# Altium PCB FieldSensor.PcbDoc
Units mm, origin at the board's own origin, x right, y up, seen from the top; angles counter-clockwise.
Board outline 34.2 x 92.15 mm, 2 copper layers (Top Layer, Bottom Layer), stack 0.151 mm thick; 64 components, 59 nets, 185 pads, 182 vias.
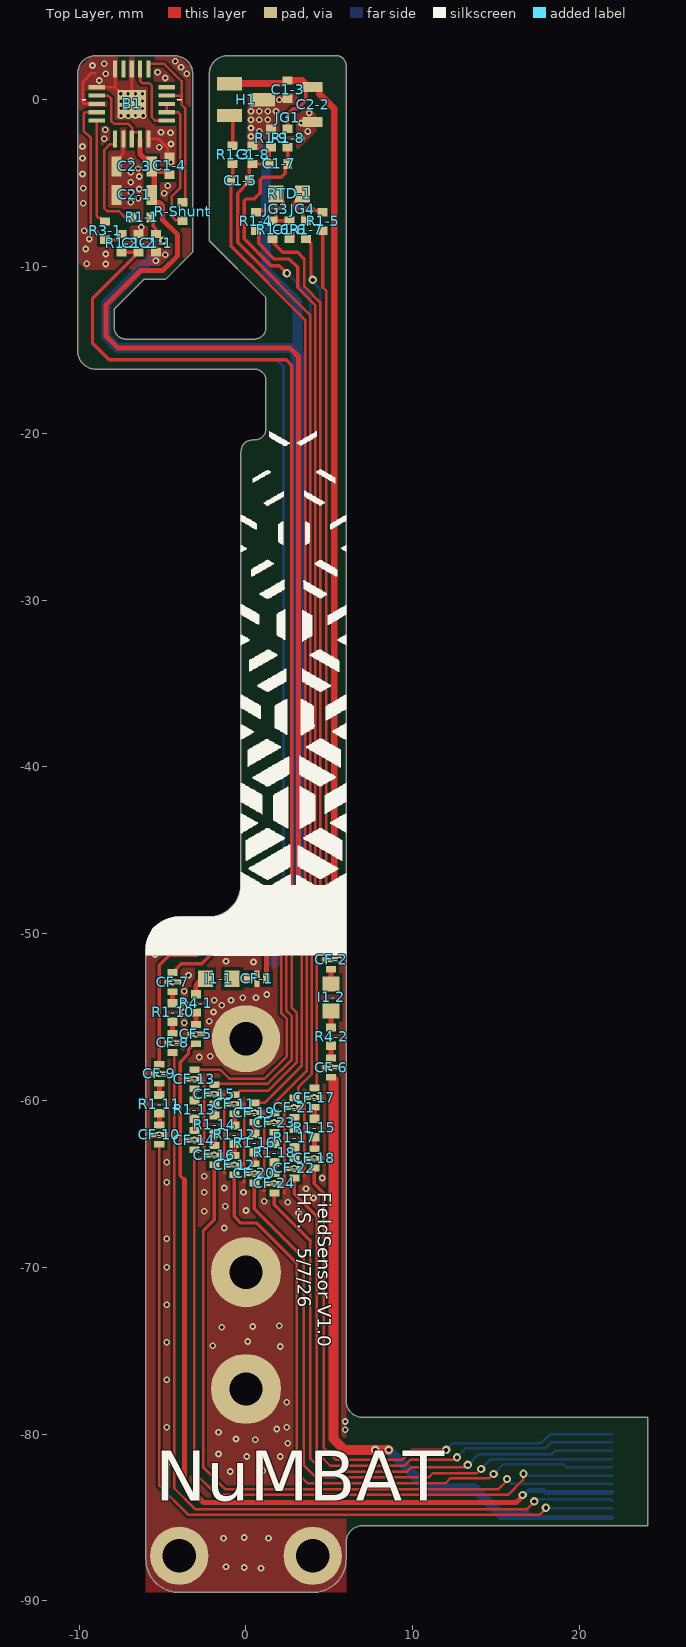
[diagram p0: Top Layer view]
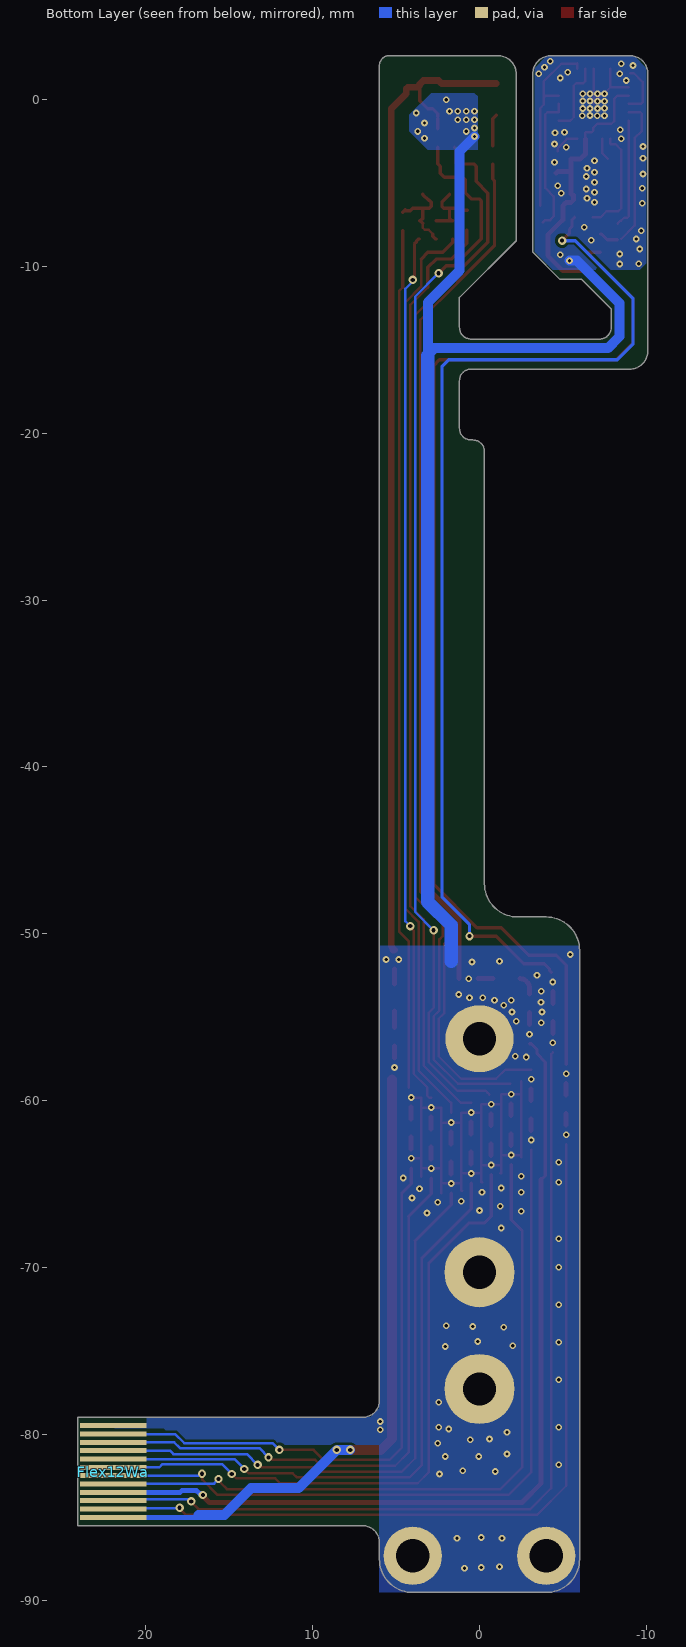
[diagram p1: Bottom Layer view, seen from below]

## Layer stack, top to bottom
Top Solder: solder mask 0.012, FC-001, Dk 4
Top Solder: solder mask 0.0254, SM-001, Dk 4
Top Layer: signal copper 0.0356
Dielectric 1: dielectric 0.08, FR-4, Dk 4.8
Bottom Layer: signal copper 0.0356
Flex Bottom Coverlay: solder mask 0.0254, SM-001, Dk 4
Flex Bottom Coverlay: solder mask 0.012, FC-001, Dk 4

## Board outline
-9,-16.15 cw(c-9,-15.05) -10.1,-15.05 -10.1,1.55 cw(c-9,1.55) -9,2.65 -4.3,2.65 cw(c-4.3,1.55) -3.2,1.55 -3.2,-9.15 -4.8,-10.75 -6.1,-10.75 -7.9,-12.55 -7.9,-13.65 ccw(c-7.2,-13.65) -7.2,-14.35 0.5,-14.35 ccw(c0.5,-13.65) 1.2,-13.65 1.2,-11.85 -2.2,-8.45 -2.2,1.55 cw(c-1.1,1.55) -1.1,2.65 5.4,2.65 cw(c5.4,2.05) 6,2.05 6,-78 ccw(c7,-78) 7,-79 24.1,-79 24.1,-85.5 7,-85.5 ccw(c7,-86.5) 6,-86.5 6,-87.5 cw(c4,-87.5) 4,-89.5 -4,-89.5 cw(c-4,-87.5) -6,-87.5 -6,-51 cw(c-4,-51) -4,-49 -2.3,-49 ccw(c-2.3,-47) -0.3,-47 -0.3,-21.1 cw(c0.4,-21.1) 0.4,-20.4 0.5,-20.4 ccw(c0.5,-19.7) 1.2,-19.7 1.2,-16.85 ccw(c0.5,-16.85) 0.5,-16.15

## Design rules (kind name [scope] priority, off if disabled: settings)
Clearance [All] p1: gap=0.2 ignorepadtopadclearanceinfootprint=TRUE except(0: Arc-Text Track-Text SMDPad-Text THPad-Text Via-Text Fill-Text Poly-Text Region-Text Text-Text Text-Hole; 0.15: Arc-Arc Arc-Track Arc-Fill Arc-Poly Arc-Region Track-Track Track-Fill Track-Poly Track-Region THPad-Fill THPad-Poly THPad-Region; 0.17: Arc-SMDPad Arc-THPad Arc-Via Track-SMDPad Track-THPad Track-Via SMDPad-SMDPad SMDPad-THPad SMDPad-Via THPad-Via Via-Via; 0.22: SMDPad-Hole THPad-Hole Via-Hole; 0.25: Fill-Hole Poly-Hole Region-Hole)
DiffPairsRouting [All] p1: maxlimit=0.254 minlimit=0.254 mostfreqgap=0.254 toplayer_minwidth=0.381 toplayer_maxwidth=0.381 toplayer_prefwidth=0.381 bottomlayer_minwidth=0.381 bottomlayer_maxwidth=0.381 bottomlayer_prefwidth=0.381 substack1={8121588E-2F91-4279-9075-7C01D68EC4AE} toplayer_{8121588e-2f91-4279-9075-7c01d68ec4ae}_minwidth=0.381 toplayer_{8121588e-2f91-4279-9075-7c01d68ec4ae}_maxwidth=0.381 toplayer_{8121588e-2f91-4279-9075-7c01d68ec4ae}_prefwidth=0.381 bottomlayer_{8121588e-2f91-4279-9075-7c01d68ec4ae}_minwidth=0.381 bottomlayer_{8121588e-2f91-4279-9075-7c01d68ec4ae}_maxwidth=0.381 bottomlayer_{8121588e-2f91-4279-9075-7c01d68ec4ae}_prefwidth=0.381 maxuncoupledlength=12.7
HoleSize [All] p1: absolutevalues=TRUE maxlimit=99 minlimit=0.025 maxpercent=80.000 minpercent=20.000
MinimumSolderMaskSliver [All] p1: minsoldermaskwidth=0
PlaneConnect [All] p1: planeconnectstyle=Direct reliefexpansion=0.508 reliefentries=4 reliefconductorwidth=0.254 reliefairgap=0.254
PolygonConnect [All] p1: connectstyle=Direct reliefconductorwidth=0.5 reliefentries=4 polygonreliefangle="90 Angle" airgapwidth=0.254
RoutingVias [All] p1: holewidth=0.45 width=0.8 viastyle="Through Hole" minholewidth=0.3 minwidth=0.5 maxholewidth=2 maxwidth=10
SolderMaskExpansion [All] p1: expansion=0.102 istentingtop=FALSE
Width [All] p1: maxlimit=50 minlimit=0.1 preferedwidth=0.254 substack1={8121588E-2F91-4279-9075-7C01D68EC4AE} minimp=50.000000 maximp=50.000000 favimp=50.000000
26 further rules are at their usual default settings.

## Components (designator, comment, footprint, x,y, rotation, side; value= is the part's Value field where it differs from the comment)
B1 "DRV425_FluxGate" 20-WQFN -6.851,-0.253 r0 top
C1-1 "100pF Non Magnetic" 0402 -5.4,-9.15 r90 top
C1-2 "100pF Non Magnetic" 0402 -6.45,-9.15 r90 top
C1-3 "100pF Non Magnetic" 0402 2.5,1.15 r270 top
C1-4 "100pF Non Magnetic" 0402 -4.6,-4.5 r90 top
C1-5 "100pF Non Magnetic" 0402 0.2,-4.85 r180 top
C1-6 "100pF Non Magnetic" 0402 2.6,-7.25 r270 top
C1-7 "100pF Non Magnetic" 0402 2.5,-3.85 r180 top
C1-8 "100pF Non Magnetic" 0402 0.4,-3.85 r90 top
C2-1 "0.22uF Non Magnetic" 0805_Compact -7.75,-5.7 r0 top
C2-2 "0.22uF Non Magnetic" 0805_Compact 4,-1.35 r90 top
C2-3 "0.22uF Non Magnetic" 0805_Compact -7.75,-4 r0 top
CF-1 "0.22u" 0402-Passthrough 1.225,-52.7 r180 top
CF-2 "0.22u" 0402-Passthrough 5.1,-50.975 r270 top
CF-5 "0.22u" 0402-Passthrough -3,-55.45 r270 top
CF-6 "0.22u" 0402-Passthrough 5.1,-57.45 r270 top
CF-7 "0.22u" 0402-Passthrough -4.4,-52.325 r270 top
CF-8 "0.22u" 0402-Passthrough -4.4,-55.975 r270 top
CF-9 "0.22u" 0402-Passthrough -5.2,-57.825 r270 top
CF-10 "0.22u" 0402-Passthrough -5.2,-61.475 r270 top
CF-11 "0.22u" 0402-Passthrough -0.7,-59.65 r270 top
CF-12 "0.22u" 0402-Passthrough -0.7,-63.3 r270 top
CF-13 "0.22u" 0402-Passthrough -3.1,-58.15 r270 top
CF-14 "0.22u" 0402-Passthrough -3.1,-61.8 r270 top
CF-15 "0.22u" 0402-Passthrough -1.9,-59.05 r270 top
CF-16 "0.22u" 0402-Passthrough -1.9,-62.7 r270 top
CF-17 "0.22u" 0402-Passthrough 4.1,-59.25 r270 top
CF-18 "0.22u" 0402-Passthrough 4.1,-62.9 r270 top
CF-19 "0.22u" 0402-Passthrough 0.5,-60.15 r270 top
CF-20 "0.22u" 0402-Passthrough 0.5,-63.8 r270 top
CF-21 "0.22u" 0402-Passthrough 2.9,-59.85 r270 top
CF-22 "0.22u" 0402-Passthrough 2.9,-63.5 r270 top
CF-23 "0.22u" 0402-Passthrough 1.7,-60.75 r270 top
CF-24 "0.22u" 0402-Passthrough 1.7,-64.4 r270 top
Flex12Wa "F12" FLex12Way 21.95,-79.5 r0 top
H1 "DRV5055_Hall" SOT23-3 -1,0.95 r0 top
I1-1 "39nH" 0603 -2.425,-52.7 r0 top
I1-2 "39nH" 0603 5.1,-54.625 r90 top
JG1 "Jumper_Ground_Tiny" GndConnectorTiny 2.5,-1 r180 top
JG3 "Jumper_Ground_Tiny" GndConnectorTiny 1.8,-6.5 r180 top
JG4 "Jumper_Ground_Tiny" GndConnectorTiny 3.4,-6.5 r180 top
R1-1 "100 Non Magnetic" 0402 -6.8,-7.05 r0 top
R1-2 "100 Non Magnetic" 0402 -7.45,-9.15 r90 top
R1-3 "100 Non Magnetic" 0402 -0.8,-2.75 r270 top
R1-4 "100 Non Magnetic" 0402 0.6,-7.85 r90 top
R1-5 "100 Non Magnetic" 0402 4.6,-6.75 r270 top
R1-6 "100 Non Magnetic" 0402 1.6,-8.35 r90 top
R1-7 "100 Non Magnetic" 0402 3.6,-8.35 r90 top
R1-8 "100 Non Magnetic" 0402 2.5,-2.85 r90 top
R1-9 "100 Non Magnetic" 0402 1.5,-2.85 r90 top
R1-10 "100 Non Magnetic" 0402 -4.4,-54.175 r270 top
R1-11 "100 Non Magnetic" 0402 -5.2,-59.675 r270 top
R1-12 "100 Non Magnetic" 0402 -0.7,-61.5 r270 top
R1-13 "100 Non Magnetic" 0402 -3.1,-60 r270 top
R1-14 "100 Non Magnetic" 0402 -1.9,-60.9 r270 top
R1-15 "100 Non Magnetic" 0402 4.1,-61.1 r270 top
R1-16 "100 Non Magnetic" 0402 0.5,-62 r270 top
R1-17 "100 Non Magnetic" 0402 2.9,-61.7 r270 top
R1-18 "100 Non Magnetic" 0402 1.7,-62.6 r270 top
R3-1 "60.4" 0402 -8.45,-8.4 r90 top
R4-1 "510m" 0402 -3,-53.625 r270 top
R4-2 "510m" 0402 5.1,-55.625 r270 top
R-Shunt "15.0 0.1%" 0402 -3.8,-6.15 r270 top
RTD-1 "RTD_SMD" 0603 3.4,-5.65 r180 top

## Footprints (in the part's own frame and the unit in brackets; to place one, negate y for a bottom-side part, rotate by r counter-clockwise, add the part's x,y. Pads: shape width x height; smd on the part's side, far side on the other; paste and mask are expansions set on the pad)
20-WQFN [mm]
  rect 1x0.25 smd paste+0: 1(-2.1,1) 2(-2.1,0.5) 3(-2.1,0) 4(-2.1,-0.5) 5(-2.1,-1) 11(2.1,-1) 12(2.1,-0.5) 13(2.1,0) 14(2.1,0.5) 15(2.1,1)
  rect 0.25x1 smd paste+0: 6(-1,-2.1) 7(-0.5,-2.1) 8(0,-2.1) 9(0.5,-2.1) 10(1,-2.1) 16(1,2.1) 17(0.5,2.1) 18(0,2.1) 19(-0.5,2.1) 20(-1,2.1)
  rect 1.7x1.7 smd paste+0: 21(0,0)
  silkscreen extent -2.95,0.26 2.95,0.26
0402 [mm]
  rect 0.5x0.6 smd mask+0.05: 1(0,0) 2(1.1,0)
0402-Passthrough [mm]
  rect 0.4x0.6 smd mask+0.05: 1(0,0) 2(1.15,0)
  rect 0.3x1 smd mask+0.05: 3(0.575,0)
0603 [mm]
  rect 0.9x1 smd mask+0.05: 1(0,0) 2(1.6,0)
0805_Compact [mm]
  rect 0.6x1.2 smd: 1(2.1,0) 2(0,0)
FLex12Way [mm]
  rect 4x0.3 smd far side mask+0.15: 1(0,0) 2(0,-0.5) 3(0,-1) 4(0,-1.5) 5(0,-2) 6(0,-2.5) 7(0,-3) 8(0,-3.5) 9(0,-4) 10(0,-4.5) 11(0,-5) 12(0,-5.5)
GndConnectorTiny [mm]
  rect 0.2x0.2 smd paste-100 mask+0.1: 1(0,0.15)
  rect 0.2x0.2 smd paste-10 mask+0.1: 2(0,0)
SOT23-3 [mm]
  rect 1.5x0.8 smd mask+0.02: 1(0,0) 2(0,-1.9) 3(2,-0.95)

## Part data
C1-1 C1-2 C1-3 C1-4 C1-5 C1-6 C1-7 C1-8 C2-1 C2-2 C2-3: library part Capacitor1
  C1-1 C1-2 C1-3 C1-4 C1-5 C1-6 C1-7 C1-8: Digikey P/N=1608-1288-1-ND
  C2-1 C2-2 C2-3: Digikey P/N=1608-1296-1-ND
CF-1 CF-2 CF-5 CF-6 CF-7 CF-8 CF-9 CF-10 CF-11 CF-12 CF-13 CF-14 CF-15 CF-16 CF-17 CF-18 CF-19 CF-20 CF-21 CF-22 CF-23 CF-24: library part CapFeedthrough, Digikey P/N=445-YFF15AC1V224MT0Y0NCT-ND
I1-1 I1-2: library part Inductor0603, Digikey P/N=490-15822-1-ND
R1-1 R1-2 R1-3 R1-4 R1-5 R1-6 R1-7 R1-8 R1-9 R1-10 R1-11 R1-12 R1-13 R1-14 R1-15 R1-16 R1-17 R1-18 R3-1 R4-1 R4-2 R-Shunt: library part Res1
  R1-1 R1-2 R1-3 R1-4 R1-5 R1-6 R1-7 R1-8 R1-9 R1-10 R1-11 R1-12 R1-13 R1-14 R1-15 R1-16 R1-17 R1-18: Digikey P/N=541-1899-1-ND
  R3-1: Digikey P/N=A139440CT-ND
  R4-1 R4-2: Digikey P/N=541-4385-1-ND
  R-Shunt: Digikey P/N=A102634CT-ND
B1: Digikey P/N=296-DRV425QWRTJRQ1CT-ND
H1: Digikey P/N=296-DRV5055Z3QDBZRCT-ND
RTD-1: Digikey P/N=2952-P1K0.0603.3FC.B-ND

## Free pads (board coordinates)
  oval 4.1x4 hole 2 mask+0: 0(0,-56.3)
  round 3.5 hole 2 mask+0: 3(-4,-87.3) 3(4,-87.3)
  round 4.2 hole 2 mask+0: 3(0,-77.3) 4(0,-70.3)

## Via types
v1: diameter 0.4, hole 0.2, Top Layer to Bottom Layer, tented both sides, 164 vias
v2: diameter 0.5, hole 0.25, Top Layer to Bottom Layer, tented both sides, 18 vias

## Nets (pads, with @x,y where several pads share a name; then routed paths per layer and width w, separated by ;. In a path a pad name is that pad's centre, name@x,y a point inside that pad or via, vN(x,y) a via of type N, cw(c..) or ccw(c..) an arc to the next point about the centre after c; other vN are vias at no path point)
5V: CF-6.2 Flex12Wa.12 | length 42.3
  Top Layer w0.6: CF-6.2@5.25,-58.75 5.25,-80.3 5.9,-80.95 ; 6.05,-80.95 v2(7.75,-80.95) v2(8.556,-80.95)
  Bottom Layer w0.3: 15.3,-85 Flex12Wa.12
  Bottom Layer w0.6: v2(7.75,-80.95) v2(8.556,-80.95) 10.856,-83.25 13.7,-83.25 15.3,-84.85 16.85,-84.85
BOut1: C1-1.2 CF-7.1 R1-1.2 | length 62.9
  Top Layer w0.2: R1-1.2 -5.55,-7.2 -5.55,-7.6 -5.4,-7.75 C1-1.2 -5.35,-8.05 -4.954,-8.445 v2(-4.954,-8.447) ; CF-7.1@-4.3,-52.325 -4.2,-52.225 -4.2,-52.125 -3.875,-51.8 -2.65,-51.8 -1,-50.15 v2(0.6,-50.15)
  Bottom Layer w0.2: v2(-4.954,-8.447) -5.747,-8.447 -9.2,-11.9 -9.2,-14.657 -8.257,-15.6 1.85,-15.6 2.25,-16 2.25,-47.8 0.6,-49.45 v2(0.6,-50.15)
BOut1_Con: CF-8.2 Flex12Wa.10 | length 53.2
  Top Layer w0.15: CF-8.2 -4.3,-57.225 -4.3,-83.25 -3.05,-84.5 16.85,-84.5 17.286,-84.064 v2(17.286,-84.04)
  Bottom Layer w0.15: v2(17.286,-84.04) 17.381,-84.04 17.501,-83.919 19.937,-83.919 19.943,-83.925 21.875,-83.925 Flex12Wa.10
BOut2: C1-2.1 CF-9.1 R1-2.1 | length 66.9
  Top Layer w0.2: R1-2.1@-7.25,-9.15 C1-2.1@-6.5,-9.15 ; C1-2.1 C1-2.1@-6.5,-9.15 ; CF-9.1 -5.2,-51.9 -4.6,-51.3 -2.95,-51.3 -1.3,-49.65 0.15,-49.65 2.75,-47.05 2.75,-15.95 2.4,-15.6 -8.202,-15.6 -9.2,-14.602 -9.2,-11.9 -6.65,-9.35 -6.65,-9.3 C1-2.1@-6.5,-9.15
BOut2_Con: CF-10.2 Flex12Wa.11 | length 48.6
  Top Layer w0.15: CF-10.2 -5.2,-83.1 -3.45,-84.85 17.6,-84.85 17.981,-84.469 v2(17.981,-84.417)
  Bottom Layer w0.15: v2(17.981,-84.417) 18.014,-84.45 21.9,-84.45 Flex12Wa.11
GND: B1.1 B1.3 B1.7 B1.10 B1.18 B1.20 B1.21 C1-1.1 C1-2.2 C1-3.2 C1-4.2 C1-8.2 C2-1.2 C2-2.2 C2-3.2 CF-1.3 CF-2.3 CF-5.3 CF-6.3 CF-7.3 CF-8.3 CF-9.3 CF-10.3 CF-11.3 CF-12.3 CF-13.3 CF-14.3 CF-15.3 CF-16.3 CF-17.3 CF-18.3 CF-19.3 CF-20.3 CF-21.3 CF-22.3 CF-23.3 CF-24.3 Flex12Wa.1 H1.3 pad.0 pad.3 pad.4 R1-9.2 | length 123.4
  Top Layer w0.15: -9.05,1.6 -9.25,1.6 -9.783,1.067 -9.783,-0.165 -9.695,-0.253 B1.3 ; B1.1 -7.851,0.747 ; B1.20 -7.851,0.747 ; C2-3.2@-7.7,-3.55 -7.351,-3.201 B1.7 ; v1(-7.5,0.35) -7.354,0.35 B1.21@-7.05,0.046 ; B1.21@-7.354,0.25 -7.851,0.747 ; B1.21@-7.05,0.35 B1.21@-7.05,0.046 ; B1.21 B1.18 ; B1.21@-6.851,-0.153 B1.21@-7.05,0.046 ; B1.10 -5.247,-2.353 -4.7,-2.9 -4.7,-3.1 ; -2.5,-63.4 -2.5,-63.275 ; -2.5,-58.85 -2.5,-59.625 ; -1.25,-64.365 -1.3,-64.365 -1.3,-63.875 ; -0.177,-64.9 -0.1,-64.9 -0.1,-64.375 ; 1.023,-65.4 1.1,-65.4 1.1,-64.975 ; 1.1,-61.3 1.1,-61.325 ; 2.3,-65.55 2.3,-64.975 ; 2.3,-61.3 2.3,-61.325 ; 3.5,-64.565 3.5,-64.075 ; 3.5,-64.02 3.5,-64.075 ; v1(4.1,-63.475) 3.5,-63.475 ; v1(4.1,-59.825) 3.5,-59.825 3.5,-60.425 ; -2.5,-63.275 -2.5,-59.625 ; -2.5,-63.275 v1(-1.9,-63.275) -1.9,-63.3 -1.3,-63.3 ; -2.5,-59.625 v1(-1.9,-59.625) -1.3,-59.625 -1.3,-60.225 ; -1.3,-63.875 -1.3,-63.3 ; -1.3,-63.875 v1(-0.7,-63.875) -0.1,-63.875 ; -1.3,-63.3 -1.3,-60.225 ; -1.3,-60.225 v1(-0.7,-60.225) -0.1,-60.225 -0.1,-60.725 ; -0.1,-64.375 -0.1,-63.875 ; -0.1,-64.375 v1(0.5,-64.375) 1.1,-64.375 ; -0.1,-63.875 -0.1,-60.725 ; -0.1,-60.725 v1(0.5,-60.725) 1.1,-60.725 1.1,-61.325 ; 1.1,-64.975 1.1,-64.375 ; 1.1,-64.975 v1(1.7,-64.975) 2.3,-64.975 ; 1.1,-64.375 1.1,-61.325 ; 1.1,-61.325 v1(1.7,-61.325) 2.3,-61.325 ; 2.3,-64.975 2.3,-64.075 ; 2.3,-64.075 2.3,-61.325 ; 2.3,-64.075 v1(2.9,-64.075) 3.5,-64.075 ; 2.3,-61.325 2.3,-60.425 v1(2.9,-60.425) 3.5,-60.425 ; 3.5,-64.075 3.5,-63.475 ; 3.5,-63.475 3.5,-60.425
  Bottom Layer w0.6: v1(-5.4,-9.65) -5.85,-9.65 -8.4,-12.2 -8.4,-14.2 -7.7,-14.9 2.7,-14.9 3.143,-15.343 ; v1(0.3,-2.2) 1.2,-3.1 1.2,-10.25 3.1,-12.15 3.1,-15.343
  Bottom Layer w0.8: 1.7,-51.65 1.7,-49.5 3.1,-48.1 3.1,-15.343
  other v1: 0.9,-88.05 -0.1,-88 -1.2,-87.95 -1.35,-86.25 1.35,-86.25 -0.1,-86.2 2.4,-82.4 -0.95,-82.25 1,-82.2 -4.75,-81.85 0.05,-81.35 2.05,-81.35 -1.65,-81.2 2.5,-80.55 0.55,-80.35 -0.6,-80.3 -1.65,-79.9 5.95,-79.75 1.85,-79.7 -4.75,-79.6 2.45,-79.6 5.95,-79.25 2.45,-78.1 -4.75,-76.75 2.05,-74.75 -2,-74.7 -4.75,-74.5 0.1,-74.45 -1.45,-73.6 0.4,-73.55 2,-73.5 -4.75,-72.25 -4.75,-70 -4.75,-68.3 -1.3,-67.65 3.15,-66.75 -2.5,-66.65 0,-66.6 -1.25,-66.35 2.5,-66.1 1.1,-66.05 4.05,-65.85 -2.5,-65.5 -0.15,-65.5 3.6,-65.3 -1.3,-65.25 -4.75,-64.9 4.577,-64.65 -2.5,-64.55 -4.75,-63.7 -3.1,-62.375 -5.2,-62.05 -3.1,-58.725 -5.2,-58.4 5.1,-58.025 -2.8,-57.4 -2.15,-57.35 -4.4,-56.55 -3,-56.025 -3.7,-55.35 -2.2,-55.25 -3.75,-54.7 -1.95,-54.7 -1.45,-54.3 -3.685,-54.103 -1.9,-54 -0.9,-54 -0.2,-53.85 0.6,-53.85 1.25,-53.65 -3.693,-53.453 -4.4,-52.9 0.65,-52.7 -3.45,-52.5 0.45,-51.7 -1.2,-51.65 4.85,-51.55 5.6,-51.55 -5.45,-51.25 -8.4,-9.85 -9.55,-9.825 -4.848,-9.294 -8.4,-9.25 -9.6,-8.95 -6.7,-8.425 -9.4,-8.35 -9.7,-7.85 -6.275,-7.65 -9.75,-6.2 -6.9,-6.15 -6.45,-5.9 -4.9,-5.6 -6.9,-5.55 -6.4,-5.35 -9.75,-5.3 -4.7,-5.15 -6.9,-4.95 -6.4,-4.6 -9.8,-4.45 -6.9,-4.35 -6.45,-4.1 -4.5,-3.75 -6.9,-3.65 -9.8,-3.5 -5.2,-2.85 -9.8,-2.8 -4.5,-2.65 -8.5,-2.342 3.3,-2.3 -4.525,-1.975 -5.1,-1.95 0.8,-1.9 3.7,-1.9 -8.447,-1.796 0.3,-1.7 3.3,-1.4 0.3,-1.2 0.8,-1.2 1.3,-1.2 -7.497,-0.964 -7.066,-0.96 -6.625,-0.95 -6.16,-0.964 3.8,-0.8 0.3,-0.7 0.8,-0.7 1.3,-0.7 1.8,-0.7 -7.492,-0.517 -7.071,-0.531 -6.628,-0.527 -6.2,-0.525 -7.496,-0.082 -7.071,-0.084 -6.628,-0.078 -6.2,-0.075 2,0 -7.075,0.35 -6.625,0.35 -6.2,0.35 -8.8,1.15 -4.85,1.3 -8.4,1.55 -3.55,1.55 -5.3,1.65 -3.9,1.95 -9.2,2.05 -8.5,2.15 -4.25,2.3
GND_Hall: C1-5.1 C1-7.2 C1-8.1 CF-15.1 R1-9.1 | length 64.1
  Top Layer w0.15: CF-15.1@-1.85,-59 1.3,-59 2.75,-57.55 2.75,-54.95 2.4,-54.6 2.4,-50.35 2.2,-50.15 2.2,-49.45 3.85,-47.8 3.85,-12.9 1.9,-10.95
  Top Layer w0.2: R1-9.1 1.4,-2.95 C1-7.2 0.35,-3.85 0.2,-4 0.2,-4.9 -0.5,-5.6 -0.5,-8.55 1.9,-10.95
GND_Hall_Con: CF-16.2 Flex12Wa.8 | length 43.9
  Top Layer w0.15: -2.55,-67.8 -2.55,-82 -1.25,-83.3 15.15,-83.3 15.514,-82.936 15.514,-82.931 15.65,-82.795 v2(15.65,-82.7)
  Top Layer w0.2: -2.55,-67.8 -1.9,-67.15 CF-16.2
  Bottom Layer w0.15: v2(15.65,-82.7) 15.65,-82.709 15.913,-82.972 21.922,-82.972 Flex12Wa.8
HallOut1: C1-5.2 CF-13.1 R1-3.2 | length 62.6
  Top Layer w0.15: CF-13.1 -1.55,-58.15 -1,-58.7 1.1,-58.7 2.45,-57.35 2.45,-55.1 2.1,-54.75 2.1,-50.6 1.9,-50.4 1.9,-49.15 3.55,-47.5 3.55,-13.2 1.3,-10.95
  Top Layer w0.2: R1-3.2 -0.8,-4.75 C1-5.2 -0.9,-8.75 1.3,-10.95
HallOut1_Con: CF-14.2 Flex12Wa.7 | length 45.7
  Top Layer w0.15: CF-14.2 -3.1,-82.3 -1.75,-83.65 15.711,-83.65 16.623,-82.738 16.623,-82.402 v2(16.64,-82.384)
  Bottom Layer w0.15: v2(16.64,-82.384) 16.735,-82.384 16.851,-82.5 Flex12Wa.7
NetB1_4: B1.4 R1-2.2 R3-1.1 | length 10
  Top Layer w0.15: B1.4 -9.645,-0.753 -9.733,-0.841 -9.733,-1.867 -9.3,-2.3 -9.3,-7.55 R3-1.1@-8.5,-8.35
  Top Layer w0.2: R3-1.1@-8.25,-8.4 -7.65,-8.4 -7.3,-8.05 R1-2.2@-7.25,-8.05
NetB1_5: B1.5 R3-1.2 | length 6.6
  Top Layer w0.15: B1.5 -8.951,-6.987 -8.863,-7.075 -8.675,-7.075 -8.5,-7.25 -8.45,-7.25 R3-1.2@-8.275,-7.425
NetB1_6: B1.6 R1-1.1 | length 6.5
  Top Layer w0.15: B1.6 -7.851,-2.636 -7.876,-2.661 -8.159,-2.661 -8.5,-3.002 -8.5,-6.506 -8.306,-6.7 -7.6,-6.7 -7.25,-7.05 R1-1.1
NetB1_11: B1.11 B1.17 | length 4.4
  Top Layer w0.15: B1.17 -6.351,1.117 -6.234,1 -5.8,1 -5.65,0.85 -5.65,-1.05 -5.447,-1.253 B1.11
NetB1_12: B1.12 B1.13 R-Shunt.2 | length 8.5
  Top Layer w0.15: B1.13 B1.12 -4.067,-0.753 -3.95,-0.87 -3.95,-5.3 -4.45,-5.8 ; -4.45,-5.8 -4.45,-7 -4.234,-7.216 -3.934,-7.216 R-Shunt.2@-3.8,-7.35
NetB1_14: B1.14 B1.16 R-Shunt.1 | length 11.3
  Top Layer w0.15: B1.16 -5.851,2.199 -5.85,2.2 -5.85,2.174 -5.826,2.15 -4.9,2.15 -3.85,1.1 -3.85,0.1 ; B1.14 -3.997,0.247 -3.85,0.1 ; R-Shunt.1@-3.65,-6.35 -3.65,-0.5 -3.85,-0.3 -3.85,0.1
NetC1-6_1: C1-6.1 JG3.1 R1-6.2 | length 1.7
  Top Layer w0.2: R1-6.2 R1-6.2@1.65,-7.25 ; R1-6.2@1.8,-7.15 JG3.1 ; R1-6.2@1.8,-7.1 R1-6.2@1.65,-7.25 ; C1-6.1 R1-6.2@1.65,-7.25
NetC1-6_2: C1-6.2 JG4.1 R1-7.2 | length 2.4
  Top Layer w0.15: 2.8,-8.05 3.056,-7.794 3.283,-7.794 3.4,-7.677 R1-7.2@3.4,-7.4
  Top Layer w0.2: C1-6.2 2.65,-8.35 2.8,-8.2 2.8,-8.05 ; R1-7.2@3.4,-7.4 R1-7.2@3.55,-7.25 ; R1-7.2@3.4,-7.15 JG4.1 ; R1-7.2@3.4,-7.1 R1-7.2@3.55,-7.25 ; R1-7.2 R1-7.2@3.55,-7.25
NetCF-1_2: CF-1.2 I1-1.2 | length 0.9
  Top Layer w0.3: I1-1.2 CF-1.2
NetCF-2_2: CF-2.2 I1-2.2 | length 0.9
  Top Layer w0.3: I1-2.2 CF-2.2
NetCF-5_1: CF-5.1 R4-1.2 | length 0.7
  Top Layer w0.3: CF-5.1 R4-1.2
NetCF-6_1: CF-6.1 R4-2.2 | length 0.7
  Top Layer w0.3: CF-6.1 R4-2.2
NetCF-7_2: CF-7.2 R1-10.1 | length 0.7
  Top Layer w0.3: R1-10.1 CF-7.2
NetCF-8_1: CF-8.1 R1-10.2 | length 0.7
  Top Layer w0.3: CF-8.1 R1-10.2
NetCF-9_2: CF-9.2 R1-11.1 | length 0.7
  Top Layer w0.3: R1-11.1 CF-9.2
NetCF-10_1: CF-10.1 R1-11.2 | length 0.7
  Top Layer w0.3: CF-10.1 R1-11.2
NetCF-11_2: CF-11.2 R1-12.1 | length 0.7
  Top Layer w0.3: R1-12.1 CF-11.2
NetCF-12_1: CF-12.1 R1-12.2 | length 0.7
  Top Layer w0.3: CF-12.1 R1-12.2
NetCF-13_2: CF-13.2 R1-13.1 | length 0.7
  Top Layer w0.3: R1-13.1 CF-13.2
NetCF-14_1: CF-14.1 R1-13.2 | length 0.7
  Top Layer w0.3: CF-14.1 R1-13.2
NetCF-15_2: CF-15.2 R1-14.1 | length 0.7
  Top Layer w0.3: R1-14.1 CF-15.2
NetCF-16_1: CF-16.1 R1-14.2 | length 0.7
  Top Layer w0.3: CF-16.1 R1-14.2
NetCF-17_2: CF-17.2 R1-15.1 | length 0.7
  Top Layer w0.3: R1-15.1 CF-17.2
NetCF-18_1: CF-18.1 R1-15.2 | length 0.7
  Top Layer w0.3: CF-18.1 R1-15.2
NetCF-19_2: CF-19.2 R1-16.1 | length 0.7
  Top Layer w0.3: R1-16.1 CF-19.2
NetCF-20_1: CF-20.1 R1-16.2 | length 0.7
  Top Layer w0.3: CF-20.1 R1-16.2
NetCF-21_2: CF-21.2 R1-17.1 | length 0.7
  Top Layer w0.3: R1-17.1 CF-21.2
NetCF-22_1: CF-22.1 R1-17.2 | length 0.7
  Top Layer w0.3: CF-22.1 R1-17.2
NetCF-23_2: CF-23.2 R1-18.1 | length 0.7
  Top Layer w0.3: R1-18.1 CF-23.2
NetCF-24_1: CF-24.1 R1-18.2 | length 0.7
  Top Layer w0.3: CF-24.1 R1-18.2
NetH1_2: H1.2 R1-3.1 | length 1.9
  Top Layer w0.2: H1.2@-1,-0.93 -0.8,-1.13 R1-3.1
NetI1-1_1: I1-1.1 R4-1.1 | length 1.3
  Top Layer w0.3: R4-1.1 -3,-53.275 cw(c-2.425,-53.275) I1-1.1
NetI1-2_1: I1-2.1 R4-2.1 | length 1
  Top Layer w0.3: R4-2.1 I1-2.1
NetJG1_1: JG1.1 R1-8.2 | length 0.6
  Top Layer w0.2: R1-8.2 JG1.1
NetJG3_2: JG3.2 R1-4.2 RTD-1.2 | length 2.5
  Top Layer w0.2: R1-4.2@0.725,-6.625 1.025,-6.625 1.262,-6.625 1.388,-6.5 2.133,-6.5 2.25,-6.383 2.25,-6.15 1.8,-5.7 RTD-1.2
NetJG4_2: JG4.2 R1-5.1 RTD-1.1 | length 2.8
  Top Layer w0.2: 2.9,-6.2 2.9,-6.383 3.017,-6.5 JG4.2 4,-6.5 4.15,-6.65 R1-5.1@4.45,-6.65 ; 2.9,-6.15 3.017,-6.033 3.05,-6.033 3.4,-5.683 RTD-1.1 ; R1-5.1@4.45,-6.6 R1-5.1
RTD_D1: CF-17.1 R1-5.2 | length 51.7
  Top Layer w0.15: CF-17.1@4.25,-59.25 4.25,-50.45 4.8,-49.9 4.8,-11.445 4.6,-11.245
  Top Layer w0.2: 4.6,-11.245 R1-5.2
RTD_D1_Con: CF-18.2 Flex12Wa.2 | length 35.2
  Top Layer w0.15: 4.65,-65.55 4.65,-80.8 5.4,-81.55 9.35,-81.55 9.95,-80.95 v2(12,-80.95)
  Top Layer w0.2: CF-18.2 4.1,-65 4.65,-65.55
  Bottom Layer w0.15: v2(12,-80.95) 12.4,-80.55 17.7,-80.55 18.25,-80 Flex12Wa.2
RTD_D2: CF-19.1 R1-4.1 | length 56.1
  Top Layer w0.15: CF-19.1 1.1,-60.15 3.35,-57.9 3.35,-49.15 4.15,-48.35 4.15,-12.3 3.1,-11.25
  Top Layer w0.2: R1-4.1@0.767,-7.826 0.767,-8.617 1.7,-9.55 2.6,-9.55 3.1,-10.05 3.1,-11.25
RTD_D2_Con: CF-20.2 Flex12Wa.5 | length 37.4
  Top Layer w0.15: 3.45,-69.45 3.45,-81.85 4.2,-82.6 10.95,-82.6 11.2,-82.35 13.837,-82.35 14.087,-82.1 v2(14.1,-82.1)
  Top Layer w0.2: CF-20.2 0.5,-66.5 3.45,-69.45
  Bottom Layer w0.15: v2(14.1,-82.1) 14.7,-81.5 Flex12Wa.5
RTD_S1: CF-21.1 R1-7.1 | length 52.6
  Top Layer w0.15: CF-21.1 3,-59.85 3.125,-59.725 3.125,-59.225 3.95,-58.4 3.95,-49.813 4.15,-49.613 v2(4.15,-49.55)
  Top Layer w0.2: R1-7.1 3.65,-8.35 3.8,-8.5 3.8,-8.55 3.9,-8.65 3.9,-10.6 v2@4.1,-10.8
  Bottom Layer w0.15: v2(4,-10.8) 4,-10.895 4.45,-11.345 4.45,-49.25 v2(4.15,-49.55)
RTD_S1_Con: CF-22.2 Flex12Wa.3 | length 35.6
  Top Layer w0.15: 4.25,-66.95 4.25,-81.1 5.05,-81.9 9.5,-81.9 9.848,-81.552 12.403,-81.552 12.555,-81.4 v2(12.65,-81.4)
  Top Layer w0.2: CF-22.2 2.9,-65.6 4.25,-66.95
  Bottom Layer w0.15: v2(12.65,-81.4) 13.2,-80.85 17.95,-80.85 18.3,-80.5 Flex12Wa.3
RTD_S2: CF-23.1 R1-6.1 | length 55.4
  Top Layer w0.15: CF-23.1 1.7,-60.15 3.65,-58.2 3.65,-49.3 4.45,-48.5 ; 3.5,-11 3.5,-11.2 ; 3.5,-9.55 3.5,-11.2 ; 4.45,-48.45 4.45,-12.15 3.5,-11.2
  Top Layer w0.2: R1-6.1 1.6,-8.55 2.2,-9.15 3.1,-9.15 3.5,-9.55
RTD_S2_Con: CF-24.2 Flex12Wa.4 | length 35.7
  Top Layer w0.15: 3.85,-68.4 3.85,-81.45 4.65,-82.25 9.65,-82.25 9.921,-81.979 13.077,-81.979 13.205,-81.85 v2(13.3,-81.85)
  Top Layer w0.2: CF-24.2 1.7,-66.25 3.85,-68.4
  Bottom Layer w0.15: v2(13.3,-81.85) 13.95,-81.2 18.35,-81.2 18.55,-81 Flex12Wa.4
VCC_FluxGate: B1.2 B1.8 B1.9 C1-4.1 C2-1.1 C2-3.1 CF-1.1 | length 71.7
  Top Layer w0.15: B1.2 -8.267,0.247 -8.085,0.065 -8.085,-1.265 -7.9,-1.45 -7.05,-1.45 -6.824,-1.676 -6.824,-1.842 -6.826,-1.844 -6.711,-1.959 -6.376,-1.959 -6.351,-1.984 B1.9
  Top Layer w0.3: B1.9 -6.351,-3.249 -6.05,-3.55 -5.5,-3.55 C2-3.1@-5.5,-4.15 ; C2-1.1 -5.65,-6 -5.5,-6.15 -5.2,-6.15 -5.101,-6.249 -5,-6.35 -5,-7.2 -4.1,-8.1 -4.1,-9.35 -5,-10.25 -6.324,-10.25 -8.4,-12.326 -8.4,-14.15 -7.65,-14.9 2.65,-14.9 3.15,-15.4 3.15,-47.25 1.225,-49.175 CF-1.1 ; C2-1.1@-5.5,-5.651 C2-3.1@-5.5,-4.15 ; C1-4.1@-4.6,-4.4 -4.7,-4.3 -5.35,-4.3 C2-3.1@-5.5,-4.15
VCC_FluxGate_Con: CF-5.2 Flex12Wa.9 | length 53.4
  Top Layer w0.2: -3.7,-64.75 -3.95,-64.5 -3.95,-57.7 -3.45,-57.2 -3.45,-56.95 -3.1,-56.6 CF-5.2
  Top Layer w0.3: -3.7,-64.75 -3.7,-82.95 -2.55,-84.1 16.2,-84.1 v2@16.486,-83.814 ; v2@16.486,-83.813 16.586,-83.713 v2(16.586,-83.659)
  Bottom Layer w0.3: v2(16.586,-83.659) 16.64,-83.659 16.74,-83.559 16.795,-83.559 16.961,-83.393 17.843,-83.393 17.95,-83.5 Flex12Wa.9
VCC_Hall: C1-3.1 C2-2.1 CF-2.1 H1.1 JG1.2 | length 60.3
  Top Layer w0.2: JG1.2 2.5,-0.85 2.8,-0.55 3.1,-0.55 3.4,-0.25 3.588,-0.062 3.588,0.638 C2-2.1@3.7,0.75
  Top Layer w0.4: H1.1@-1,0.97 2.27,0.97 2.45,1.15 C1-3.1 3.366,1.15 3.6,0.916 3.6,0.85 3.7,0.75 C2-2.1 4.3,0.75 4.4,0.65 4.4,0.35 5.3,-0.55 5.3,-50.741 5.2,-50.841 5.2,-50.975 CF-2.1
VCC_Hall_Out: C1-7.1 CF-11.1 R1-8.1 | length 63.8
  Top Layer w0.15: CF-11.1@-0.6,-59.65 -0.475,-59.525 -0.475,-59.513 -0.387,-59.425 1.325,-59.425 3.05,-57.7 3.05,-54.75 2.75,-54.45 v2(2.75,-49.8)
  Top Layer w0.2: v2(2.45,-10.4) 2,-9.95 1.5,-9.95 -0.1,-8.35 -0.1,-6.067 0.017,-5.95 0.5,-5.95 0.858,-5.592 0.858,-4.792 1,-4.65 2.1,-4.65 2.35,-4.4 2.35,-4 C1-7.1 R1-8.1
  Bottom Layer w0.15: v2(2.45,-10.4) 3.85,-11.8 3.85,-48.7 v2(2.75,-49.8)
VCC_Hall_Out_Con: CF-12.2 Flex12Wa.6 | length 39.7
  Top Layer w0.15: 3.05,-69.75 3.05,-82.3 3.7,-82.95 11.95,-82.95 12.25,-82.65 14.587,-82.65 14.837,-82.4 v2(14.85,-82.4)
  Top Layer w0.2: CF-12.2 -0.7,-66.95 -0.3,-67.35 0.65,-67.35 3.05,-69.75
  Bottom Layer w0.15: v2(14.85,-82.4) 15.45,-81.8 19,-81.8 19.2,-82 Flex12Wa.6
pads on no net: B1.15 B1.19

## Polygon pours and split planes (outlines as drawn)
no net on Flex Bottom Coverlay "PLN1" (solid, pour order 9): -5.999,-50.75 6.001,-50.75 6.001,-89.5 -5.999,-89.5 -5.999,-87.401
no net on Flex Bottom Coverlay "NONET_L02_P002" (solid, pour order 2): -9,2.65 ccw(c-9,1.55) -10.1,1.55 -10.1,-6.225 ccw(c-9.325,-6.225) -9.325,-7 -3.775,-7 ccw(c-3.775,-6.425) -3.2,-6.425 -3.2,1.55 ccw(c-4.3,1.55) -4.3,2.65
GND on Top Layer "PLN1" (solid, pour order 8): -5.999,-50.714 6.001,-50.714 6.001,-89.5 -5.999,-89.5 -5.999,-87.401
GND on Top Layer "PLN1" (solid, pour order 4): -9.303,2.597 -10,1.9 -10,-9.808 -9.605,-10.203 -4.405,-10.203 -3.305,-9.103 -3.305,1.905 -3.997,2.597 -8.505,2.597
GND on Top Layer "PLN1" (solid, pour order 6): 0.3,0.4 0.1,0.2 0.1,-3 3.1,-3 4.2,-1.9 4.2,-0.9 2.9,0.4
no net on Top Overlay "PLN1" (solid): -6,-51.3 -6,-50.9 cw(c-4.1,-50.9) -4.1,-49 -2.2,-49 ccw(c-2.2,-47.1) -0.3,-47.1 6.001,-47.1 6.001,-51.3 2,-51.3
GND on Bottom Layer "PLN1" (solid, pour order 10): 21.983,-79.653 21.979,-79.649 18.938,-79.649 18.65,-79.937 18.65,-80 18.25,-80 17.6,-80.65 5.75,-80.65 5.75,-78.2 6.55,-79 19.95,-79 19.95,-79.35 19.955,-79.345 21.96,-79.345
GND on Bottom Layer "PLN1" (solid, pour order 3): -9.3,2.6 -10,1.9 -10,-9.8 -9.6,-10.2 -4.4,-10.2 -3.3,-9.1 -3.3,1.9 -4,2.6 -8.5,2.6
GND on Bottom Layer "PLN1" (solid, pour order 7): -6,-50.713 6,-50.713 6,-89.5 -6,-89.5 -6,-87.4
GND on Bottom Layer "PLN1" (solid, pour order 5): 0.3,0.4 0.1,0.2 0.1,-3 3.1,-3 4.2,-1.9 4.2,-0.9 2.9,0.4

## Silkscreen, mask and mechanical layers (free items; w line width, h text height)
Top Overlay:
  drawing of 51 lines, arcs and shapes, not listed
  text "FieldSensor V1.0 / H.S.   5/7/26" at 3.1,-65.5 h0.8 r270
  text "NuMBAT" at -5.45,-84 h3
Mechanical 1:
  lines w0.01: -10.1,-15.05 ccw(c-9,-15.05) -9,-16.15 0.5,-16.15 cw(c0.5,-16.85) 1.2,-16.85 1.2,-19.7 cw(c0.5,-19.7) 0.5,-20.4 0.4,-20.4 ccw(c0.4,-21.1) -0.3,-21.1 -0.3,-47 cw(c-2.3,-47) -2.3,-49 -4,-49 ccw(c-4,-51) -6,-51 -6,-87.5 ccw(c-4,-87.5) -4,-89.5 4,-89.5 ccw(c4,-87.5) 6,-87.5 6,-86.5 cw(c7,-86.5) 7,-85.5 24.1,-85.5 24.1,-79 7,-79 cw(c7,-78) 6,-78 6,2.05 ccw(c5.4,2.05) 5.4,2.65 -1.1,2.65 ccw(c-1.1,1.55) -2.2,1.55 -2.2,-8.45 1.2,-11.85 1.2,-12.05 1.2,-13.65 cw(c0.5,-13.65) 0.5,-14.35 -4.2,-14.35 -7.2,-14.35 cw(c-7.2,-13.65) -7.9,-13.65 -7.9,-12.55 -7.4,-12.05 -6.1,-10.75 -5.3,-10.75 -4.8,-10.75 -3.2,-9.15 -3.2,1.55 ccw(c-4.3,1.55) -4.3,2.65 -9,2.65 ccw(c-9,1.55) -10.1,1.55 -10.1,1.35 -10.1,-15.05
Mechanical 2:
  rectangle: 18.8,-85.5 24.1,-79